# Altium PCB PCB_Palm_v2.0.PcbDoc (part 3 of 3)
Units mil, origin at the board's own origin, x right, y up, seen from the top; angles counter-clockwise.
Board outline 1773 x 1966 mil, 4 copper layers (Top Layer, Signal_1, Signal_2, Bottom Layer), stack 62.008 mil thick; 91 components, 87 nets, 389 pads, 224 vias.
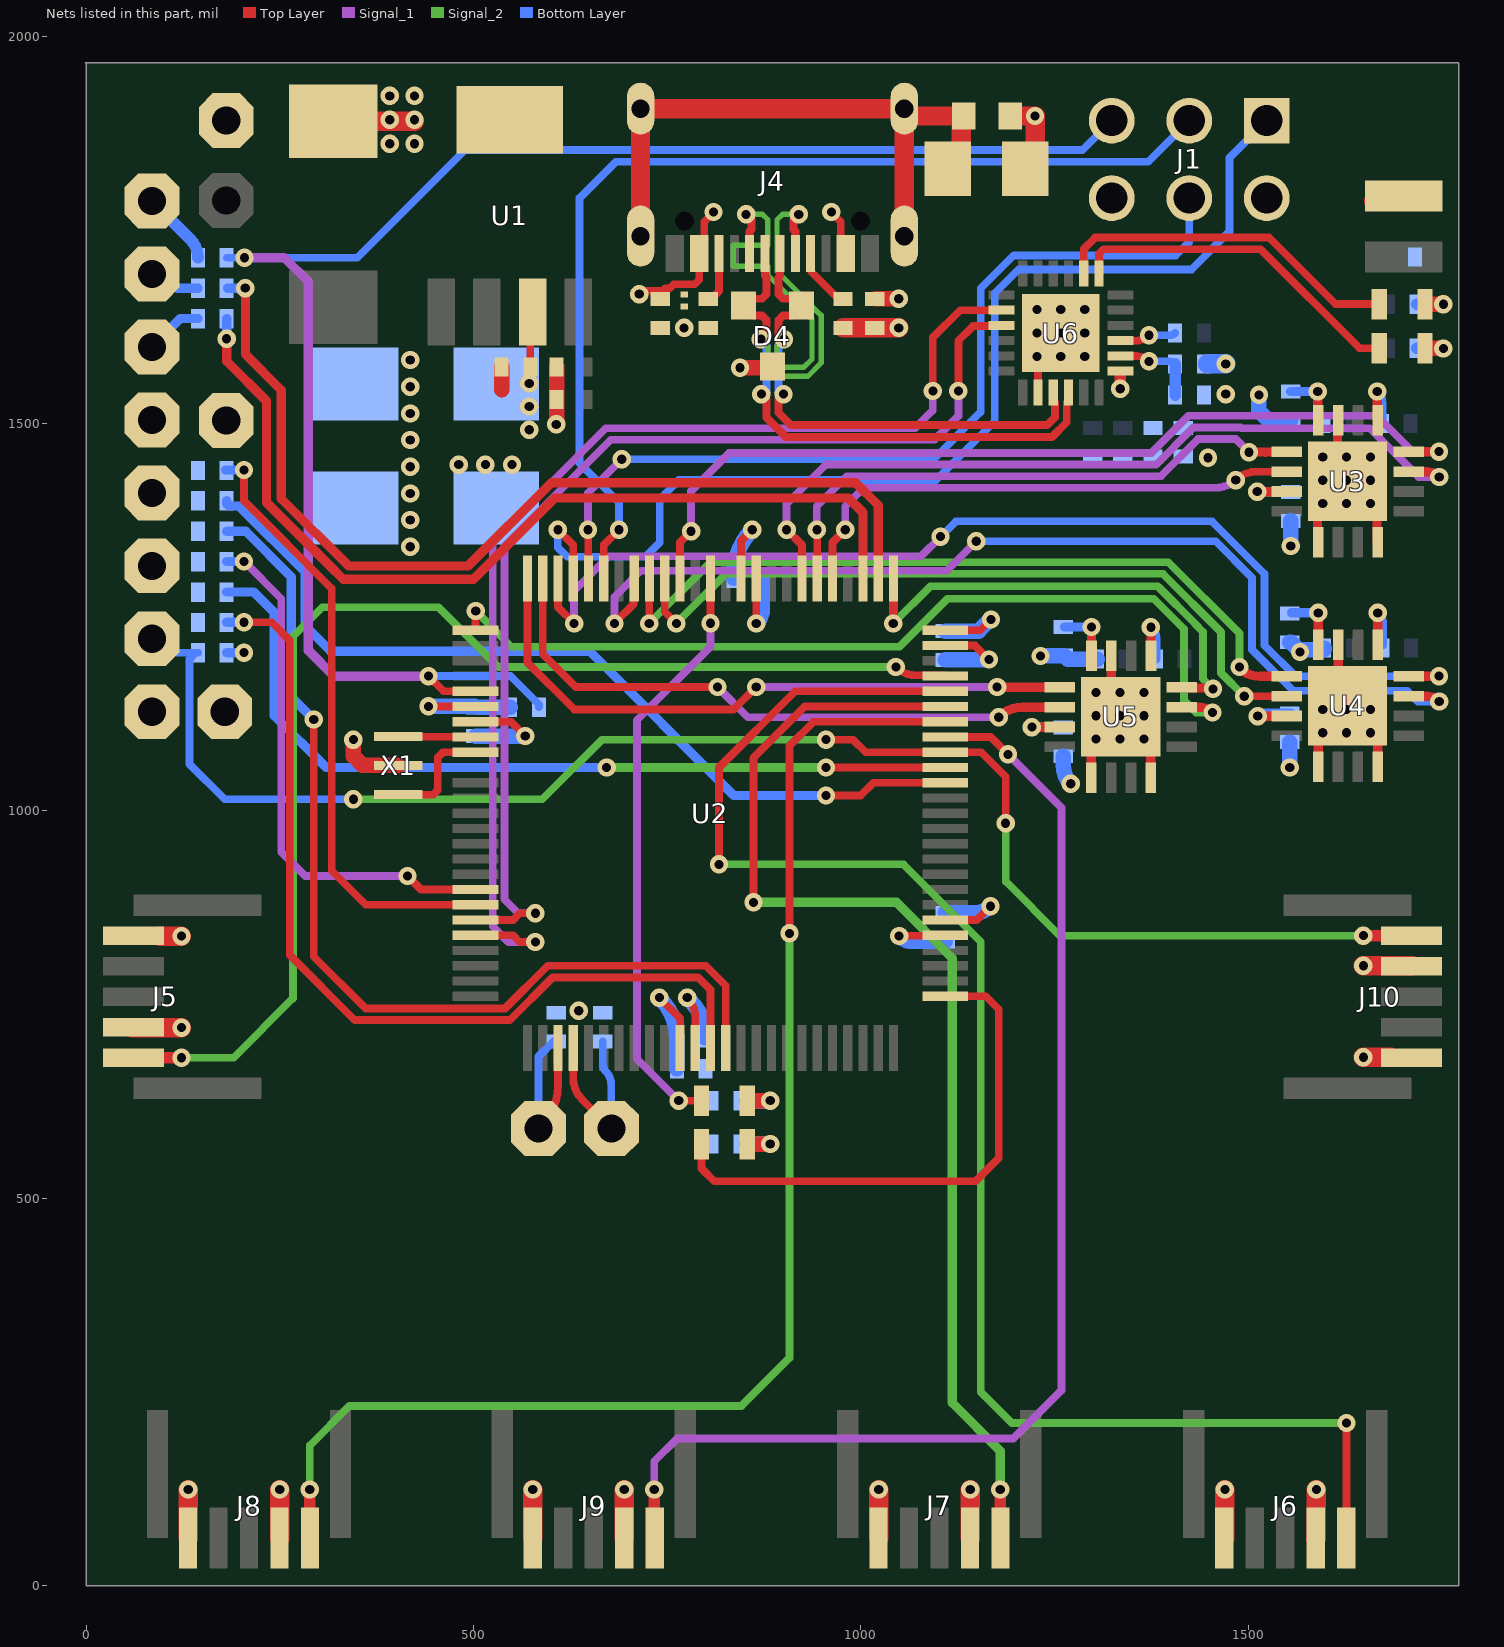
[diagram p4: the nets of this part, all layers, seen from the top]

## Via types
v1: diameter 23.62, hole 11.81, Top Layer to Bottom Layer, tented both sides, 223 vias
v2: diameter 23.62, hole 11.81, Top Layer to Bottom Layer, 1 vias

## Nets (pads, with @x,y where several pads share a name; then routed paths per layer and width w, separated by ;. In a path a pad name is that pad's centre, name@x,y a point inside that pad or via, vN(x,y) a via of type N, cw(c..) or ccw(c..) an arc to the next point about the centre after c; other vN are vias at no path point) (continued)
GND: C1.1 C2.1 C3.1 C4.2 C5.2 C6.2 C7.2 C8.2 C9.2 C10.2 C12.1 C13.1 C15.1 C16.1 C17.1 C19.1 C20.1 C22.2 C23.2 C25.2 C26.2 C27.2 C28.2 D1.2 D4.3 J1.6 J5.5 J6.5 J7.5 J8.5 J9.5 J10.5 J11.1 J21.1 J22.1 R2.1 R3.1 R4.1 R8.2 R9.2 R24.1 Ra.1 U1.5 U2.11 U2.32 U2.62 U2.81 U2.99 U3.1 U3.4 U3.11 U3.17 U4.1 U4.4 U4.11 U4.17 U5.1 U5.4 U5.11 U5.17 U6.2 U6.25 X1.2 | length 2626.6
  Top Layer w10: U2.32@502.85,1115.11 548.5,1115.11 v1(567,1096.61) ; v1(776,759) cw(c751.1,734.1) 786.32,734.1 786.32,727.94 U2.62@786.32,693.85 ; U2.11@845.37,1300.15 845.37,1348.37 v1(860,1363) ; U2.81@1109.15,859.2 1149.68,859.2 v1(1167.48,877.01) ; U2.99@1109.15,1213.54 1147.31,1213.54 v1(1165.39,1195.45) ; v1(1227.25,1586.69) 1228.07,1586.69 U6.25@1228.7,1587.31 ; U6.2@1228.7,1540.07 U6.25@1228.7,1587.31 ; U6.25@1258.23,1616.84 U6.25@1228.7,1587.31
  Top Layer w12: U5.1@1297.67,1042.94 1297.67,1083.68 U5.17@1335.67,1121.68 ; U5.11@1323.47,1200.42 1323.47,1133.88 U5.17@1335.67,1121.68 ; U5.4@1374.47,1042.94 1374.47,1082.88 U5.17@1335.67,1121.68 ; U3.1@1589.58,1346.88 1589.58,1387.62 U3.17@1627.58,1425.62 ; U4.1@1590.32,1061.16 1590.32,1101.9 U4.17@1628.32,1139.9 ; U3.11@1615.38,1504.36 1615.38,1437.82 U3.17@1627.58,1425.62 ; U4.11@1616.12,1218.64 U4.11@1616.12,1214.58 1616.12,1152.1 U4.17@1628.32,1139.9 ; U3.4@1666.38,1346.88 1666.38,1386.82 U3.17@1627.58,1425.62 ; U4.4@1667.12,1061.16 1667.12,1101.1 U4.17@1628.32,1139.9
  Top Layer w20: v1(345,1092) 345,1070.72 356.72,1059 402.6,1059 X1.2@403,1058.6 ; 536.5,1543.5 C1.1@536.5,1573.08 ; v1@607,1501 ccw(c605.79,1502.21) v1@607.5,1502.21 ; v1@607.5,1499 C3.1@607.5,1531.08 C2.1@607.5,1573.08 ; v2(844,1572) 884.37,1572 D4.3@886,1573.63
  Top Layer w25: J5.5@95.96,838.34 v1(123.29,838.34) ; J8.5@131.9,60.97 v1(131.9,124) ; C10.2@312.16,1894 316,1890.16 v1@424,1890.16 ; U1.5@542.06,1890.16 U1.5@544,1892.1 ; J9.5@576.57,60.97 v1(576.57,124) ; R8.2@977,1623.5 C22.2@1018,1623.5 v1(1049,1623.5) ; J7.5@1023.23,60.97 v1(1023.23,124) ; Ra.1@1193,1897 v1(1225,1897) 1225,1842 C17.1@1212,1829 ; J6.5@1469.9,60.97 v1(1469.9,124) ; v1(1648.67,682.14) 1676,682.14 1676.15,682 J10.5@1684.17,682
  Bottom Layer w20: C7.2@502.85,1096.61 v1(567,1096.61) ; v1(776,759) 779.35,755.65 cw(c730.7,707) C9.2@799.5,707 ; C5.2@835.87,1300.15 835.87,1304.75 cw(c918.26,1304.75) C5.2@836.08,1310.55 ; C5.2@836.08,1300 C5.2@836.08,1310.55 ; v1(860,1363) ccw(c918.26,1304.75) 852.95,1354.97 ccw(c918.26,1304.75) C5.2@836.08,1310.55 ; C4.2@1109,868.5 1146.94,868.5 ccw(c1146.94,897.55) v1(1167.48,877.01) ; C6.2@1109.17,1195.02 1109.39,1195.23 1165.18,1195.23 v1(1165.39,1195.45) ; v1(1232,1200) 1260.85,1200 C20.1@1261.41,1200.56 1262.91,1200.56 1267.41,1196.06 C19.1@1304.91,1196.06 ; v1(1514,1537) 1514,1516.22 1525.72,1504.5 C13.1@1555,1504.5 ; C16.1@1553.74,1217.72 1555.24,1217.72 1563.42,1209.53 1566.82,1206.13 v1(1566.82,1205) 1567.8,1205 1570.52,1207.72 1597.24,1207.72 1598.24,1208.72 C15.1@1598.24,1210.22
  Bottom Layer w25: R24.1@1448,1577 v1(1471,1577)
  other v1: 1303.59,1092.75 1334.47,1092.75 1365.34,1092.75 1596.25,1100.9 1627.13,1100.9 1658,1100.9 1303.59,1122.9 1334.47,1122.9 1365.34,1122.9 1596.25,1131.06 1627.13,1131.06 1658,1131.06 1303.59,1153.06 1334.47,1153.06 1365.34,1153.06 1596.25,1396.69 1627.13,1396.69 1658,1396.69 1596.25,1426.84 1627.13,1426.84 1658,1426.84 1448.13,1455.8 1596.25,1457 1627.13,1457 1658,1457 607,1499 1258.13,1586.69 1289,1586.69 1227.25,1616.84 1258.13,1616.84 1289,1616.84 772,1623.5 1227.25,1647 1258.13,1647 1289,1647 392,1861.25 424,1861.25 392,1892.12 424,1892.12 392,1923 424,1923
LED_PIN: LED2.1 U2.76 | length 702.1
  Top Layer w10: LED2.1@794.47,570 794.47,538.53 811,522 1148,522 1178,552 1178,744 1161.22,760.78 U2.76@1109.15,760.78
MEGA_MISO: J1.1 U2.22 | length 1432.3
  Top Layer w10: v1(609,1363) 628.84,1343.17 U2.22@628.84,1300.15
  Bottom Layer w10: v1(609,1363) 609,1340 621,1328 722,1328 740.5,1346.5 740.5,1402.5 765,1427 1097,1427 1173,1503 1173,1668 1204,1699 1427,1699 1476,1748 1476,1843 J1.1@1524,1891
MEGA_MOSI: J1.4 U2.21 | length 1173.5
  Top Layer w10: v1@648.26,1363 648.26,1300.41 U2.21@648.52,1300.15
  Signal_1 w10: v1(648,1363) 648,1410.47 v1(691.53,1454)
  Bottom Layer w10: v1@689.61,1452.08 v1(691.53,1454) 1094,1454 1155,1515 1155,1674.61 1197.39,1717 1406.65,1717 1424,1734.35 J1.4@1424,1791
MEGA_RST: C24.2 J1.5 R1.2 U2.30 | length 2185.9
  Top Layer w10: v1(442,1174) 461.52,1154.48 U2.30@502.85,1154.48
  Signal_1 w12: v1(204.5,1714) 256,1714 287,1683 287,1207 320,1174 v1(442,1174)
  Bottom Layer w10: C24.2@181.5,1714 v1(204.5,1714) 350,1714 489,1853 1286,1853 J1.5@1324,1891 ; v1(442,1174) 548,1174 584.5,1137.5 R1.2@584.5,1134
MEGA_RXD: R18.1 U2.2 | length 1271.5
  Top Layer w12: v1(205.5,1674.75) 205.69,1674.56 205.69,1589.31 252,1543 252,1403.04 338.96,1316.08 493.08,1316.08 600.69,1423.69 993.32,1423.69 1022.54,1394.46 U2.2@1022.54,1300.15
  Bottom Layer w12: R18.1@182.5,1674.75 v1(205.5,1674.75)
MEGA_SCK: J1.3 U2.20 | length 1348.6
  Top Layer w10: U2.20@668.21,1300.15 668.21,1343.17 v1(688.04,1363)
  Bottom Layer w10: v1(688.04,1363) 688.04,1397.96 637,1449 637,1791 684,1838 1371,1838 J1.3@1424,1891
MEGA_TXD: R19.1 U2.3 | length 1205.9
  Top Layer w12: v1(181.5,1609.5) 181.5,1580.5 233,1529 233,1398 313,1318 331.92,1299.08 500.08,1299.08 ; 500.12,1299.08 605.04,1404 984,1404 1002.85,1385.15 U2.3@1002.85,1300.15
  Bottom Layer w12: v1(181.5,1609.5) R19.1@181.5,1635.5
MOTOR1_CLOSE: U2.6 U3.13 | length 741.4
  Top Layer w10: U2.6@943.8,1300.15 v1@943.8,1362.48
  Top Layer w12: v1@1501.21,1463.21 1522.21,1463.21 ; 1522,1463 1522.21,1463.21 ; U3.13@1549.05,1463.21 1522.21,1463.21
  Signal_1 w10: v1(943.28,1363) 943.28,1393.28 982,1432 1387.43,1432 1435.43,1480 1484,1480 v1(1501,1463)
MOTOR1_OPEN: U2.5 U3.14 | length 684.4
  Top Layer w10: U2.5@963.48,1300.15 963.48,1346.44 v1(980.04,1363) ; v1(1484,1427) cw(c1510.12,1400.88) 1510.12,1437.82 U3.14@1549.58,1437.82
  Signal_1 w10: v1(980.04,1363) 980.04,1393.04 1004,1417 1457.03,1417 ccw(c1457.03,1457.97) 1473.99,1420.68 ccw(c1457.03,1457.97) v1@1483.85,1427
MOTOR1_SENSE: J5.1 U2.97 | length 1599
  Top Layer w10: v1(1045.27,1185.73) ccw(c1071,1211.45) 1071,1175.07 1108.24,1175.07 U2.97@1109.15,1174.17
  Top Layer w15: J5.1@60.79,681.49 v1@124.29,681.49
  Signal_2 w10: v1(123.29,681.49) 190.49,681.49 267,758 267,1225 305,1263 455,1263 532.27,1185.73 v1(1045.27,1185.73)
MOTOR2_CLOSE: U2.15 U3.8 | length 1183.1
  Top Layer w10: U2.15@766.63,1300.15 766.63,1346.63 v1(781,1361)
  Top Layer w12: U3.8@1706.32,1463.42 U3.8@1706.61,1463.71 ; U3.8@1707.06,1463.42 v1@1746.16,1463.42
  Signal_1 w10: v1(781,1361) 781,1413 830,1462 1375,1462 1423,1510 1666,1510 1712.29,1463.71 v1(1746.45,1463.71)
MOTOR2_OPEN: U2.7 U3.7 | length 1057.2
  Top Layer w10: v1(904.28,1363) 924.11,1343.17 U2.7@924.11,1300.15
  Top Layer w12: U3.7@1706.32,1437.82 U3.7@1707.21,1436.93 ; U3.7@1707.06,1437.82 1730.28,1437.82 cw(c1730.28,1414.54) v1(1746.74,1431)
  Signal_1 w10: v1(904.28,1363) 904,1363.28 904,1396 955,1447 1325,1447 1381.21,1447 1428.21,1494 1429.21,1495 1490.21,1495 1491.21,1494 1657,1494 1720,1431 v1(1746.74,1431)
MOTOR2_SENSE: J6.1 U2.96 | length 2056.7
  Top Layer w10: v1(817,931) 817,1056 915.48,1154.48 U2.96@1109.15,1154.48 ; J6.1@1626.75,60.32 1626.88,60.45 1626.88,209.87 v1(1627,210)
  Signal_2 w10: v1(817,931) 1055,931 1155,831 1155,250 1195,210 v1(1627,210)
MOTOR3_CLOSE: U2.17 U4.13 | length 1000.1
  Top Layer w10: v1(727,1242) U2.17@727,1299.89
  Top Layer w12: v1(1488.85,1185.85) 1488.85,1185 1488,1185 ccw(c1515.44,1212.44) 1515.44,1173.64 U4.13@1549.58,1173.64
  Signal_2 w10: v1(727,1242) 806,1321 1397,1321 1488.85,1229.15 v1(1488.85,1185.85)
MOTOR3_OPEN: U2.16 U4.14 | length 975
  Top Layer w10: U2.16@746.95,1300.15 746.95,1257.06 v1(762,1242) ; v1(1495,1148) U4.14@1549.57,1148.02
  Signal_2 w10: v1(762,1242) 826,1306 1390,1306 1465,1231 1465,1178 v1(1495,1148)
MOTOR3_SENSE: J7.1 U2.95 | length 1524.3
  Top Layer w10: v1(861.5,882) 861.5,1068.5 927.8,1134.8 U2.95@1109.15,1134.8
  Top Layer w15: J7.1@1180.08,60.32 v1@1180.08,125
  Signal_2 w12: v1(861.5,882) 1046,882 1118.08,809.92 1118.08,235.92 1180.08,173.92 v1(1180.08,124)
MOTOR4_CLOSE: U2.23 U4.8 | length 1438.5
  Top Layer w10: U2.23@609.15,1300.15 609.15,1262.83 v1(629.98,1242)
  Top Layer w12: U4.8@1707.06,1173.64 v1@1746.16,1173.64
  Signal_1 w10: v1(629.98,1242) 629.98,1283.98 674.7,1328.7 1077.7,1328.7 v1(1103,1354)
  Bottom Layer w10: v1(1103,1354) 1123,1374 1453.21,1374 1521,1306.21 1521,1214 1561.07,1173.93 v1(1746.45,1173.93)
MOTOR4_OPEN: U2.18 U4.7 | length 1378.9
  Top Layer w10: v1(682,1242) 706.67,1266.67 706.67,1299.24 U2.18@707.58,1300.15
  Top Layer w12: U4.7@1707.06,1148.04 1730.28,1148.04 cw(c1730.28,1124.75) v1(1746.74,1141.22)
  Signal_1 w10: v1(682,1242) 682,1276 716,1310 1111,1310 v1(1149,1348)
  Bottom Layer w10: v1(1149,1348) 1458,1348 1505,1301 1505,1208 1558,1155 1705.39,1155 1719.17,1141.22 v1(1746.74,1141.22)
MOTOR4_SENSE: J8.1 U2.94 | length 1791.6
  Top Layer w10: v1(908,842) 908,1084 939.11,1115.11 U2.94@1109.15,1115.11
  Top Layer w15: J8.1@288.75,60.32 v1@288.75,125
  Signal_2 w10: v1(288.75,124) 288.75,180.75 340,232 846,232 908,294 v1(908,842)
MOTOR5_CLOSE: U2.25 U5.13 | length 832.5
  Top Layer w10: U2.25@569.78,1300.15 569.78,1191.22 630,1131 836.06,1131 v1(865.06,1160)
  Top Layer w12: v1@1176.52,1159.48 U5.13@1256.93,1159.48
  Signal_1 w10: v1(865.06,1160) v1(1176,1160)
MOTOR5_OPEN: U2.24 U5.14 | length 802.2
  Top Layer w10: U2.24@589.47,1300.15 589.47,1202.53 632,1160 v1(815,1160)
  Top Layer w12: v1(1178,1121) cw(c1209.24,1089.76) 1209.24,1133.94 U5.14@1256.87,1133.94
  Signal_1 w10: v1(815,1160) 854,1121 v1(1178,1121)
MOTOR5_SENSE: J9.1 U2.93 | length 1603.3
  Top Layer w10: U2.93@1109.15,1095.43 1167.58,1095.43 v1(1190,1073)
  Top Layer w15: J9.1@733.42,60.32 v1(733.42,124)
  Signal_1 w10: v1(733.42,124) 733.42,160.42 763,190 1197,190 1259,252 1259,1004 v1(1190,1073)
MOTOR6_CLOSE: U2.1 U5.8 | length 623.1
  Top Layer w12: v1(1042,1242) 1042.22,1242.22 U2.1@1042.22,1300.15 ; U5.8@1414.41,1159.48 1415.15,1158.74 1454.26,1158.74 1455,1158 v1(1454.58,1157.58)
  Signal_2 w10: v1(1042,1242) 1090,1290 1383,1290 1384,1289 1384.21,1289 1432.34,1240.87 1432.34,1240.66 1441.59,1231.41 1441.59,1170.57 v1(1454.58,1157.58)
MOTOR6_OPEN: U2.26 U5.7 | length 1167.5
  Top Layer w10: v1(503,1258) 502.85,1257.85 U2.26@502.85,1233.22 U2.26@503.21,1233.58
  Top Layer w12: U5.7@1414.41,1133.88 1437.62,1133.88 cw(c1437.62,1110.6) v1(1454.08,1127.06)
  Signal_2 w10: v1(503,1258) 549,1212 1050,1212 1112,1274 1378,1274 1417.34,1234.66 1417.34,1142.55 1432.83,1127.06 v1@1444.08,1127.06
MOTOR6_SENSE: J10.1 J23.1 R16.1 U2.92 | length 2028.3
  Top Layer w10: v1(955,1092) 990,1092 1006.26,1075.74 U2.92@1109.15,1075.74 1155.26,1075.74 1187,1044 v1(1187,984)
  Top Layer w15: v1@1647.67,838.99 J10.1@1712.35,838.99
  Signal_2 w10: v1(345,1015) 589,1015 666,1092 v1(955,1092) ; v1(1187,984) 1187,909 1257.01,838.99 v1(1648.67,838.99)
  Bottom Layer w10: J23.1@85,1222.29 99.79,1222.29 118.07,1204 R16.1@141.57,1204 ; R16.1@144.5,1204 R16.1@141.57,1204 ; v1(345,1015) 179,1015 133.57,1060.43 133.57,1196 R16.1@141.57,1204
MUSCLE_SENSE1: R13.1 U2.91 | length 1099.4
  Top Layer w10: v1@955,1056.06 U2.91@1109.15,1056.06
  Signal_2 w12: v1@672.03,1056.03 v1@954.97,1056.03
  Bottom Layer w12: R13.1@181.5,1282.47 216.53,1282.47 243,1256 243,1123 309.94,1056.06 v1(672,1056.06)
  other v1: 955,1056
MUSCLE_SENSE2: R11.1 U2.90 | length 1134.4
  Top Layer w10: v1(955,1020) 1000,1020 1016.37,1036.37 U2.90@1109.15,1036.37
  Bottom Layer w12: R11.1@181.5,1400.17 181.5,1396.67 184.5,1393.67 197.38,1393.67 283,1308.04 283,1239 316,1206 650,1206 836,1020 v1(955,1020)
NetC11_1: C11.1 U3.9 | length 79.9
  Top Layer w12: U3.9@1666.58,1504.36 v1(1666.58,1541.36)
  Bottom Layer w12: v1(1666.58,1541.36) cw(c1652.3,1527.07) 1672.5,1527.07 C11.1@1672.5,1500
NetC13_2: C13.2 U3.12 | length 71.6
  Top Layer w12: U3.12@1589.78,1504.36 v1(1589.78,1541.36)
  Bottom Layer w12: C13.2@1555.14,1541.36 v1(1589.78,1541.36)
NetC14_1: C14.1 U4.9 | length 84
  Top Layer w12: U4.9@1667.32,1214.58 v1(1667.32,1255.64)
  Bottom Layer w12: v1(1667.32,1255.64) cw(c1653.04,1241.35) 1673.24,1241.35 C14.1@1673.24,1214.28
NetC16_2: C16.2 U4.12 | length 71.6
  Top Layer w12: U4.12@1590.52,1218.64 v1(1590.52,1255.64)
  Bottom Layer w12: C16.2@1555.88,1255.64 v1(1590.52,1255.64)
NetC18_1: C18.1 U5.9 | length 80.3
  Top Layer w12: v1(1374.39,1237.14) 1374.67,1237.14 U5.9@1374.67,1200.42
  Bottom Layer w12: v1(1374.39,1237.14) 1374.67,1237.42 cw(c1360.38,1223.13) 1380.58,1223.13 C18.1@1380.58,1196.06
NetC20_2: C20.2 U5.12 | length 71.6
  Top Layer w12: U5.12@1297.87,1200.42 v1(1297.87,1237.42)
  Bottom Layer w12: C20.2@1263.23,1237.42 v1(1297.87,1237.42)
NetC24_1: C24.1 J17.1 | length 96.6
  Bottom Layer w15: J17.1@85,1787.43 134.65,1737.78 cw(c110.88,1714) C24.1@144.5,1714
NetJ4_A5: J4.A5 R8.1 | length 79.4
  Top Layer w10: J4.A5@935.21,1719.5 936.12,1718.59 936.12,1696.02 939.99,1692.15 967.64,1664.5 973,1664.5 R8.1@977,1660.5
NetJ4_B5: J4.B5 R9.1 | length 66.9
  Top Layer w10: R9.1@803,1660.5 806.5,1660.5 810.5,1664.5 817.1,1671.1 J4.B5@817.1,1719.5
NetJ14_1: J14.1 R18.2 | length 67.2
  Bottom Layer w12: J14.1@85,1693.22 99.2,1693.22 117.68,1674.75 R18.2@144.5,1674.75
NetJ15_1: J15.1 R10.2 R11.2 R12.2
NetJ16_1: J16.1 R19.2 | length 74.6
  Bottom Layer w12: J16.1@85,1599.02 121.48,1635.5 R19.2@144.5,1635.5
NetJ18_1: J18.1 R13.2 R14.2 R15.2
NetLED1_2: LED1.2 R3.2 | length 55.9
  Top Layer w20: LED1.2@857,626.08 857.08,626 v1(883.19,626)
  Bottom Layer w20: 853.53,626 v1(883.19,626)
NetLED2_2: LED2.2 R4.2 | length 56
  Top Layer w20: LED2.2@856.81,570 v1(883.19,570)
  Bottom Layer w20: 853.53,570 v1(883.19,570)
NetLED3_1: LED3.1 R21.2 | length 59.3
  Top Layer w20: LED3.1@1728.3,1654.16 1728.46,1654 v1(1752,1654) v1@1753,1654
  Bottom Layer w15: R21.2@1717.5,1654 v1(1752,1654)
NetLED4_1: LED4.1 R22.2 | length 59.3
  Top Layer w20: LED4.1@1728.3,1597.16 1728.38,1597.08 1752.92,1597.08 v1@1753,1597
  Bottom Layer w15: R22.2@1717.5,1597 v1(1752,1597)
NetR5_2: R5.2 U3.15 | length 79.8
  Top Layer w12: v1(1511.73,1412.11) 1548.73,1412.11 U3.15@1548.84,1412.22
  Bottom Layer w12: v1(1511.73,1412.11) R5.2@1554.39,1412.11
NetR6_2: R6.2 U4.15 | length 80.7
  Top Layer w12: v1(1512.47,1122.39) U4.15@1549.47,1122.39
  Bottom Layer w12: v1(1512.47,1122.39) cw(c1522.13,1112.73) 1522.13,1126.39 R6.2@1555.13,1126.39
NetR7_2: R7.2 U5.15 | length 78.7
  Top Layer w12: v1(1220.82,1108.17) U5.15@1256.82,1108.17
  Bottom Layer w12: v1@1219.82,1108.17 v1(1220.82,1108.17) R7.2@1262.47,1108.17
NetR20_1: R20.1 U6.9 | length 73.4
  Top Layer w10: U6.9@1335,1607 1355.1,1607 ccw(c1355.1,1630.9) v1(1372,1614)
  Bottom Layer w10: v1(1372,1614) 1398.87,1614 ccw(c1398.87,1623.7) R20.1@1405.73,1616.84
NetR23_2: R23.2 R24.2 U6.8 | length 113.5
  Top Layer w10: U6.8@1335,1587.31 1355.1,1587.31 cw(c1355.1,1563.42) v1(1372,1580.31)
  Bottom Layer w10: v1(1372,1580.31) 1397.35,1580.31 cw(c1397.35,1568.46) R24.2@1405.73,1576.84
  Bottom Layer w15: R23.2@1405.73,1536.84 R24.2@1405.73,1576.84
NetU2_33: U2.33 X1.1 | length 100.1
  Top Layer w10: X1.1@403,1096 403.29,1095.71 502.56,1095.71 U2.33@502.85,1095.43
NetU2_34: U2.34 X1.3 | length 147.2
  Top Layer w10: X1.3@403,1021.2 403.2,1021 448,1021 454,1027 454,1069 460.74,1075.74 U2.34@502.85,1075.74
PALM_LED: LED1.1 U2.13 | length 765.3
  Top Layer w10: v1(765,626) LED1.1@794.47,626 ; v1(806,1242.26) U2.13@806,1300.15
  Signal_1 w10: v1(765,626) 711,680 711,1117 806,1212 v1(806,1242.26)
PC0: J13.1 R25.2 U2.53 | length 254.5
  Top Layer w10: J13.1@584,590 588.49,594.49 ccw(c538.99,644) 609,644 609.15,644.15 U2.53@609.15,693.85 608.24,692.94 U2.53@608.24,675.02
  Bottom Layer w10: J13.1@584,590 584,683 603.5,702.5 R25.2@607,702.5
PC1: J12.1 R17.2 U2.54 | length 238
  Top Layer w10: U2.54@628.84,693.85 628.84,655 ccw(c667.06,655) 640.03,627.97 J12.1@678,590
  Bottom Layer w10: R17.2@667,702.5 667,672.24 ccw(c677.24,672.24) 670,665 cw(c650.68,645.68) 678,645.68 J12.1@678,590
PRGM_RX: U2.46 U6.20 | length 1476.3
  Top Layer w10: U2.46@502.85,839.52 551.21,839.52 560,830.72 v1(580,830.72) ; v1(1093,1542) 1093,1611 1128.37,1646.37 U6.20@1181.46,1646.37
  Signal_1 w10: v1(580,830.72) 545.28,830.72 525,851 525,1348 671,1494 1070,1494 1093,1517 v1(1093,1542)
PRGM_TX: U2.45 U6.21 | length 1400.4
  Top Layer w10: U2.45@502.85,859.2 551.21,859.2 560,868 v1(580,868) ; v1(1126,1542) 1126,1607 1144.78,1625.78 1180.55,1625.78 U6.21@1181.46,1626.68
  Signal_1 w10: v1(580,868) 558,868 540,886 540,1341.79 677.21,1479 1095.21,1479 1126,1509.79 v1(1126,1542)
RXD3: R15.1 U2.63 | length 1179.3
  Top Layer w10: v1(204,1243.53) 239.47,1243.53 263,1220 263,814 347,730 547,730 602,785 790,785 806,769 U2.63@806,693.85
  Bottom Layer w12: R15.1@181.65,1243.38 v1@203.85,1243.38
RXLED: LED4.2 U6.13 | length 442.7
  Top Layer w10: U6.13@1307.44,1693.61 1307.44,1719.14 1313.3,1725 1516,1725 1643.84,1597.16 LED4.2@1669.24,1597.16
SCL: R14.1 U2.43 | length 688.4
  Top Layer w10: v1(415,916) 432.43,898.57 U2.43@502.85,898.57
  Signal_1 w10: v1(204,1322) 252,1274 252,947 283,916 v1(415,916)
  Bottom Layer w10: R14.1@181.5,1321.7 R14.1@181.65,1321.85 ; v1@203.85,1321.85 v1(204,1322)
  Bottom Layer w12: R14.1@181.65,1321.85 v1@203.85,1321.85
SDA: R12.1 U2.44 | length 791.8
  Top Layer w10: v1(204,1440) 204,1400 317,1287 317,923 361.11,878.89 U2.44@502.85,878.89
  Bottom Layer w12: R12.1@180.1,1440 v1(204,1440)
SHELL: C17.2 J4.S1 J4.S2 J4.S3 J4.S4 Ra.2 | length 830.1
  Top Layer w25: J4.S2@712,1910 715.72,1906.28 J4.S1@715.72,1741.94 ; J4.S2@715.72,1906.5 J4.S3@1056.28,1906.5 J4.S3@1056.28,1901.82 ; J4.S4@1056.28,1741.94 J4.S3@1056.28,1901.82 ; C17.2@1112,1829 1129.5,1846.5 1129.5,1891 1133,1894.5 Ra.2@1133,1897 1061.1,1897 J4.S3@1056.28,1901.82
TXD3: R10.1 U2.64 | length 1283.2
  Top Layer w10: v1(294,1118) 294,812 361,745 540.79,745 595.79,800 800,800 825.69,774.31 U2.64@825.69,693.85
  Bottom Layer w12: R10.1@181.5,1360.93 206.07,1360.93 265,1302 265,1147 v1(294,1118)
TXLED: LED3.2 U6.14 | length 454.8
  Top Layer w10: U6.14@1287.76,1693.61 1287.76,1725.35 1302.41,1740 1527,1740 1612.84,1654.16 LED3.2@1669.24,1654.16
USB_D_N: D4.2 J4.A7 J4.B7 U6.4 | length 1117.6
  Top Layer w10.25: v1(871.69,1538) 878.38,1531.31 878.38,1507.68 903.31,1482.75 1246.92,1482.75 1265.85,1501.68 1265.85,1527.03 1268.07,1529.24 U6.4@1268.07,1540.07 ; J4.A7@876.16,1719.5 876.16,1690.75 878.38,1688.53 878.38,1667.1 872.37,1661.09 857.32,1661.09 D4.2@848.6,1652.37 848.6,1650.4 859.62,1639.38 872.37,1639.38 878.38,1633.38 v1@878.38,1614 ; J4.B7@915.53,1719.5 915.53,1748.24 913.31,1750.46 913.31,1763.31 v1(920,1770)
  Signal_2 w6.84: v1(871,1609) 880.08,1599.92 880.08,1574.1 893.18,1561 931.74,1561 948.84,1578.1 948.84,1639.69 891.92,1696.61 891.92,1763 898.92,1770 v1(920,1770)
  Bottom Layer w10.25: v1(871,1609) 878.38,1601.62 878.38,1541 877.98,1540.61 cw(c871.69,1546.9) v1(871.69,1538)
USB_D_P: D4.1 J4.A6 J4.B6 U6.3 | length 1117.6
  Top Layer w10.25: v1(852,1770) 858.69,1763.31 858.69,1750.46 856.47,1748.24 J4.B6@856.47,1719.5 ; v1@893.63,1614 893.63,1633.38 899.63,1639.38 912.39,1639.38 923.4,1650.4 D4.1@923.4,1652.37 914.68,1661.09 899.63,1661.09 893.63,1667.1 893.63,1688.53 895.84,1690.75 J4.A6@895.84,1719.5 ; v1(900.31,1538) 893.63,1531.31 893.63,1514 909.63,1498 1240.6,1498 1250.6,1508 1250.6,1527.03 1248.39,1529.24 U6.3@1248.39,1540.07
  Signal_2 w6.84: v1(852,1770) 873.08,1770 880.08,1763 880.08,1760.31 880.08,1730.06 835.2,1730.06 835.2,1703.22 880.08,1703.22 880.08,1691.71 881.64,1690.15 937,1634.79 937,1583 926.84,1572.84 898.08,1572.84 891.92,1579 891.92,1599.92 v1(901,1609)
  Bottom Layer w10.25: v1(900.31,1538) cw(c900.31,1546.9) 894.02,1540.61 893.63,1541 893.63,1601.62 v1(901,1609)
VCC: C4.1 C5.1 C6.1 C7.1 C8.1 C9.1 D2.2 D3.2 J1.2 J3.1 J5.2 J6.2 J7.2 J8.2 J9.2 J10.2 J19.1 J20.1 R1.1 R5.1 R6.1 R7.1 R16.2 R17.1 R25.1 U2.10 U2.31 U2.61 U2.80 U2.100 | length 1276.7
  Top Layer w10: v1(442,1135) 442.1,1134.9 502.75,1134.9 U2.31@502.85,1134.8 ; v1(740,759) 767,732 767,694.22 U2.61@766.63,693.85 U2.61@765.73,694.76 ; v1(865.06,1242) U2.10@865.06,1300.15 ; v1@1049.59,838.72 U2.80@1110.23,838.72 ; U2.80@1091.08,839.52 U2.80@1109.15,839.52 cw(c1110.33,838.34) U2.80@1110.33,840.01 ; U2.100@1109.15,1233.22 1154.22,1233.22 v1(1168,1247)
  Top Layer w25: J5.2@60.26,720.24 v1(123.29,720.24) ; J8.2@250,60.97 v1(250,124) ; J9.2@694.67,60.97 v1(694.67,124) ; J7.2@1141.33,60.97 v1(1141.33,124) ; J6.2@1587.35,60.32 1588,60.97 v1(1588,124) ; v1(1648.67,800.24) J10.2@1711.7,800.24 ; J3.1@1662,1787 1671,1796 J3.1@1701,1796
  Bottom Layer w12: R16.2@181.65,1204.15 v1@203.85,1204.15
  Bottom Layer w20: v1(442,1135) C7.1@501.46,1135 ; C7.1@505.35,1134 R1.1@547.5,1134 ; v1@635,741 v1(636,742) ; v1(740,759) 741.64,757.36 cw(c691.28,707) C9.1@762.5,707 C8.1@762.5,667 ; v1(865.06,1242) ccw(c846.19,1260.87) 872.87,1260.87 C5.1@872.87,1300.15 ; v1(1049.48,838.62) ccw(c1066.67,855.81) 1066.67,831.5 C4.1@1109,831.5 ; C6.1@1109.17,1232.02 1152.04,1232.02 1167.02,1247 v1(1168,1247) ; R7.1@1261.41,1070.56 1261.41,1058.16 ccw(c1294.16,1058.16) 1263.91,1045.61 ccw(c1294.16,1058.16) 1266.75,1040.23 ccw(c1294.16,1058.16) v1(1271,1035) ; v1(1553.74,1056.15) R6.1@1553.74,1088.72 ; v1(1555,1341.93) R5.1@1555,1374.5
  other v1: 204,1204.3 418.42,1340.96 418.42,1375.39 418.42,1409.81 418.42,1444.24 418.42,1478.66 418.42,1513.09 418.42,1547.51 418.42,1581.94
VCC#: C1.2 D3.1 U1.3 | length 81
  Top Layer w10: C1.2@573.5,1563.08 U1.3@573.5,1644.03
  other v1: 572,1492 572,1521.92 572,1551.84
VUSB: C22.1 C23.1 C25.1 C26.1 D1.1 D2.1 J4.A4/B9 J4.B4/A9 R23.1 U6.7 | length 273.4
  Top Layer w10: v1(714,1667) 718.4,1671.4 744.4,1671.4 747.5,1674.5 ; C23.1@741,1660.5 741,1668 747.5,1674.5 ; J4.B4/A9@791.51,1719.5 791.51,1685.51 785.65,1679.65 758.65,1679.65 753.5,1674.5 747.5,1674.5 ; J4.B4/A9@798,1735 798,1760.33 810,1772.33 v1(810,1773) ; v1@962,1772.33 974,1760.33 J4.A4/B9@974,1735 ; C22.1@1018,1660.5 C22.1@1019.5,1662
  Top Layer w15: v1(1335,1545) U6.7@1335,1565.63
  Top Layer w20: C22.1@1019.5,1661 v1(1049,1661)
  other v1: 481,1447 515.43,1447 549.85,1447 1471,1538 962,1773
pads on no net: J4.A1/B12 J4.A8 J4.B1/A12 J4.B8 J4.MH J5.MP1 J5.MP2 J6.MP1 J6.MP2 J7.MP1 J7.MP2 J8.MP1 J8.MP2 J9.MP1 J9.MP2 J10.MP1 J10.MP2 U1.2 U2.4 U2.8 U2.9 U2.12 U2.14 U2.19 U2.27 U2.28 U2.29 U2.35 U2.36 U2.37 U2.38 U2.39 U2.40 U2.41 U2.42 U2.47 U2.48 U2.49 U2.50 U2.51 U2.52 U2.55 U2.56 U2.57 U2.58 U2.59 U2.60 U2.65 U2.66 U2.67 U2.68 U2.69 U2.70 U2.71 U2.72 U2.73 U2.74 U2.75 U2.79 U2.82 U2.83 U2.84 U2.85 U2.86 U2.87 U2.98 U3.6 U4.6 U5.6 U6.1 U6.10 U6.11 U6.12 U6.15 U6.16 U6.17 U6.18 U6.19 U6.22 U6.23 U6.24

## Polygon pours and split planes (outlines as drawn)
6V on Signal_1 "6V_L02_P001" (solid, remove dead copper, pour order 1): 1400,1558 1400,1482 1769,1482 1769,1848 214,1848 137,1848 137,1558
VCC on Signal_1 "VCC_L02_P009" (solid, remove dead copper, pour order 9): 0,1966.23 1772,1965.77 1772,0 0,0
6V on Signal_2 "NONET_L-01_P-001" (solid, remove dead copper, pour order 7): 1458,1269 1278.91,1269 1278.91,1102.27 1281.61,1099.57 1278.91,1096.86 1278.91,1041.93 1772,1041.93 1772,1561 1502,1561 1502,1423 1458,1379
VCC on Signal_2 "VCC_L03_P010" (solid, remove dead copper, pour order 10): 0,1966.23 1772,1965.77 1772,0 0,0
VUSB on Signal_2 "VUSB_L03_P002" (solid, remove dead copper, pour order 2): 1110,1713 1493,1713 1493,1462 1458,1427 779,1427 461,1427 461,1806 1110,1806
GND on Top Layer "GND_L01_P005" (solid, remove dead copper, pour order 5): 0,1966.23 1772,1965.77 1772,0 0,0
GND on Bottom Layer "GND_L04_P008" (solid, remove dead copper, pour order 8): 0,1966.23 1772,1965.77 1772,0 0,0

## Other copper
Top Layer:
  rectangle net VCC#: 554,1474 589,1687
  region net 6V: 481,1600 481,1711 259,1711 259,1600
  rectangle net GND: 1175,1789 1254,1918
  rectangle net VUSB: 700,1650 754,1675
  rectangle net CP_VDD: 1298,1481 1333.23,1510
  rectangle net GND: 726,1604 822,1638
  rectangle net CP_VDD: 1281,1481 1314,1558
  rectangle net GND: 764,1625 780,1654.87
  rectangle net VUSB: 700,1660.5 779,1686
  region net SHELL: 738,1897.6 695,1897.6 695,1693 738,1693
  region net SHELL: 1078,1861 1078,1943.91 695,1943.91 695,1861
  rectangle net 6V: 612,1600 632.58,1698
  rectangle net GND: 144,1841 620,1944
  rectangle net SHELL: 1035,1698 1149,1944
  rectangle net VCC: 1490,1755 1753,1825
  rectangle net 6V: 625,1508 684,1698
Bottom Layer:
  rectangle net CP_VDD: 1663,1583 1692,1667
  region net MOTOR6_SENSE: 154,1191 154,1216.43 68,1216.43 68,1191
  region net NetJ15_1: 155,1390 155,1430.29 60,1430.29 60,1390
  region net NetJ18_1: 155,1295 155,1336 60,1336 60,1295
  rectangle net NetJ18_1: 134,1230.3 155.5,1335.3
  rectangle net NetJ15_1: 133,1348 155.5,1453
  rectangle net VCC: 592,728 681,757
  rectangle net GND: 787,550 820,704
  rectangle net VCC#: 467,1474 590,1600
  rectangle net GND: 1283.23,1445 1465,1470
  rectangle net VUSB: 1427,1482 1485,1554
  rectangle net VUSB: 1360,1482 1450,1507
  rectangle net CP_VDD: 1281,1481 1354,1510
  rectangle net VUSB: 467,1333 587,1461
  rectangle net VCC: 283,1328 434,1606

## Silkscreen, mask and mechanical layers (free items; w line width, h text height)
Top Overlay:
  lines w7: 757,1507 745,1519 745,1576 773,1604 773,1637 ; 803.3,1577.97 803.3,1603 ; 1211,1918 1242,1918 1257,1903 1257,1775
  text "GND" at 143.8,1934.41 h35
  text "RST" at 3.44,1829.55 h40 r270
  text "RXD" at 3.44,1736.55 h40 r270
  text "6V" at 143.8,1717.41 h35
  text "SPI" at 1370,1690.6 h40
  text "TXD" at 3.44,1642.55 h40 r270
  text "TX" at 1563,1630.21 h40
  text "RX" at 1563,1573.21 h40
  text "VCC" at 3.44,1547.84 h40 r270
  text "GND" at 140.03,1546.44 h40
  text "TP8" at 3.44,1452.84 h40 r270
  text "TP9" at 3.44,1357.84 h40 r270
  text "MOTOR6_SENSE" at 126.1,1201.44 h40
  text "VCC" at 40.16,1045.44 h40
  text "GND" at 136.03,1045.44 h40
  text "PALM_LED" at 894,601.6 h45
  text "LED_PIN" at 894.5,545.6 h45
  text "PC0" at 541.17,505.44 h40
  text "PC1" at 636.17,505.44 h40
Bottom Overlay:
  drawing of 2581 lines, arcs and shapes, not listed
  text "GND" at 343.56,1853 h60
  text "6V" at 342.95,1752.5 h60
  text "~" at 211.71,1169.97 h70
  text "~" at 164.71,719.97 h70
Board Outline:
  circle w20: c1322.5,78.75 r39.37
  circle w20: c1693.25,1887.25 r39.37
  circle w20: c78.75,1887.25 r39.37
  circle w20: c437,78.75 r39.37
  circle w20: c879.75,78.75 r39.37
  lines w20: 0,0 1772,0 1772,1966 0,1966 0,0
Fabrication:
  drawing of 295 lines, arcs and shapes, not listed
  text "Layer" at 2311.58,1734 h60
  text "Name" at 2721.49,1734 h60
  text "Material" at 3651.23,1734 h60
  text "Thickness" at 4511,1734 h60
  text "Constant" at 5160.84,1734 h60
  text "Board Layer Stack" at 5730.7,1734 h60
  text "Top Overlay" at 2721.49,1614 h60
  text "Top Solder" at 2721.49,1494 h60
  text "Solder Resist" at 3651.23,1494 h60
  text "0.39mil" at 4511,1494 h60
  text "3.5" at 5160.84,1494 h60
  text "1" at 2311.58,1374 h60
  text "Top Layer" at 2721.49,1374 h60
  text "1.38mil" at 4511,1374 h60
  text "Dielectric 2" at 2721.49,1254 h60
  text "PP-006" at 3651.23,1254 h60
  text "8.27mil" at 4511,1254 h60
  text "4.1" at 5160.84,1254 h60
  text "2" at 2311.58,1134 h60
  text "Signal_1" at 2721.49,1134 h60
  text "CF-004" at 3651.23,1134 h60
  text "0.39mil" at 4511,1134 h60
  text "Dielectric 1" at 2721.49,1014 h60
  text "FR-4" at 3651.23,1014 h60
  text "41.93mil" at 4511,1014 h60
  text "4.8" at 5160.84,1014 h60
  text "3" at 2311.58,894 h60
  text "Signal_2" at 2721.49,894 h60
  text "CF-004" at 3651.23,894 h60
  text "0.39mil" at 4511,894 h60
  text "Dielectric 3" at 2721.49,774 h60
  text "PP-006" at 3651.23,774 h60
  text "8.27mil" at 4511,774 h60
  text "4.1" at 5160.84,774 h60
  text "4" at 2311.58,654 h60
  text "Bottom Layer" at 2721.49,654 h60
  text "1.38mil" at 4511,654 h60
  text "Bottom Solder" at 2721.49,534 h60
  text "Solder Resist" at 3651.23,534 h60
  text "0.39mil" at 4511,534 h60
  text "3.5" at 5160.84,534 h60
  text "Bottom Overlay" at 2721.49,414 h60
  text "Total board thickness:" at 2311.58,294 h60
  text "62.80mil" at 4511,294 h60
Drill Drawing:
  circle w10: c-85.38,3154.27 r33.33
  lines w10: -118.71,2820.94 -52.04,2820.94 -52.04,2887.61 -118.71,2887.61 -118.71,2820.94 ; -118.71,2970.94 -85.38,2987.61 -52.04,2970.94 -68.71,3004.27 -52.04,3037.61 -85.38,3020.94 -118.71,3037.61 -102.04,3004.27 -118.71,2970.94 ; -118.71,3337.61 -52.04,3337.61 -85.38,3270.94 -118.71,3337.61 ; -118.71,3437.61 -102.04,3437.61 -102.04,3420.94 -68.71,3420.94 -68.71,3437.61 -52.04,3437.61 -52.04,3470.94 -68.71,3470.94 -68.71,3487.61 -102.04,3487.61 -102.04,3470.94 -118.71,3470.94 -118.71,3437.61 ; -118.71,3587.61 -102.04,3587.61 -85.38,3570.94 -68.71,3587.61 -52.04,3587.61 -68.71,3604.27 -52.04,3620.94 -68.71,3620.94 -85.38,3637.61 -102.04,3620.94 -118.71,3620.94 -102.04,3604.27 -118.71,3587.61
  lines w15: -178.5,2775.94 9778.72,2775.94 ; -178.5,3675.94 9778.72,3675.94 ; 372.38,2625.94 372.38,3825.94 ; 972.22,2625.94 972.22,3825.94 ; 2071.9,2625.94 2071.9,3825.94 ; 2577.77,2625.94 2577.77,3825.94 ; 3311.57,2625.94 3311.57,3825.94 ; 4811.13,2625.94 4811.13,3825.94 ; 5400.97,2625.94 5400.97,3825.94 ; 6146.77,2625.94 6146.77,3825.94 ; 7286.44,2625.94 7286.44,3825.94 ; 8376.12,2625.94 8376.12,3825.94 ; -178.5,2625.94 9778.72,2625.94 9778.72,3825.94 -178.5,3825.94 -178.5,2625.94
  text "Symbol" at -88.5,3720.94 h72
  text "Count" at 417.38,3720.94 h72
  text "Hole Size" at 1017.22,3720.94 h72
  text "Plated" at 2116.9,3720.94 h72
  text "Hole Type" at 2622.77,3720.94 h72
  text "Drill Layer Pair" at 3356.57,3720.94 h72
  text "Via/Pad" at 4856.13,3720.94 h72
  text "Pad Shape" at 5445.97,3720.94 h72
  text "Template" at 6191.77,3720.94 h72
  text "Hole Length" at 7331.44,3720.94 h72
  text "Routed Path Length" at 8421.12,3720.94 h72
  text "224" at 417.38,3570.94 h60
  text "0.300mm (11.81mil)" at 1017.22,3570.94 h60
  text "PTH" at 2116.9,3570.94 h60
  text "Round" at 2622.77,3570.94 h60
  text "Top Layer - Bottom Layer" at 3356.57,3570.94 h60
  text "Via" at 4856.13,3570.94 h60
  text "Rounded" at 5445.97,3570.94 h60
  text "(Mixed)" at 6191.77,3570.94 h60
  text "-" at 7331.44,3570.94 h60
  text "-" at 8421.12,3570.94 h60
  text "2" at 417.38,3420.94 h60
  text "0.600mm (23.62mil)" at 1017.22,3420.94 h60
  text "PTH" at 2116.9,3420.94 h60
  text "Slot" at 2622.77,3420.94 h60
  text "Top Layer - Bottom Layer" at 3356.57,3420.94 h60
  text "Pad" at 4856.13,3420.94 h60
  text "Rounded" at 5445.97,3420.94 h60
  text "r90_170h60_140r100" at 6191.77,3420.94 h60
  text "1.400mm (55.12mil)" at 7331.44,3420.94 h60
  text "0.800mm (31.50mil)" at 8421.12,3420.94 h60
  text "2" at 417.38,3270.94 h60
  text "0.600mm (23.62mil)" at 1017.22,3270.94 h60
  text "PTH" at 2116.9,3270.94 h60
  text "Slot" at 2622.77,3270.94 h60
  text "Top Layer - Bottom Layer" at 3356.57,3270.94 h60
  text "Pad" at 4856.13,3270.94 h60
  text "Rounded" at 5445.97,3270.94 h60
  text "(Mixed)" at 6191.77,3270.94 h60
  text "1.700mm (66.93mil)" at 7331.44,3270.94 h60
  text "1.100mm (43.31mil)" at 8421.12,3270.94 h60
  text "2" at 417.38,3120.94 h60
  text "0.620mm (24.41mil)" at 1017.22,3120.94 h60
  text "NPTH" at 2116.9,3120.94 h60
  text "Round" at 2622.77,3120.94 h60
  text "Top Layer - Bottom Layer" at 3356.57,3120.94 h60
  text "Pad" at 4856.13,3120.94 h60
  text "Rounded" at 5445.97,3120.94 h60
  text "c0hn62" at 6191.77,3120.94 h60
  text "-" at 7331.44,3120.94 h60
  text "-" at 8421.12,3120.94 h60
  text "14" at 417.38,2970.94 h60
  text "0.920mm (36.22mil)" at 1017.22,2970.94 h60
  text "PTH" at 2116.9,2970.94 h60
  text "Round" at 2622.77,2970.94 h60
  text "Top Layer - Bottom Layer" at 3356.57,2970.94 h60
  text "Pad" at 4856.13,2970.94 h60
  text "Octagonal" at 5445.97,2970.94 h60
  text "s180h92c50" at 6191.77,2970.94 h60
  text "-" at 7331.44,2970.94 h60
  text "-" at 8421.12,2970.94 h60
  text "6" at 417.38,2820.94 h60
  text "1.020mm (40.16mil)" at 1017.22,2820.94 h60
  text "PTH" at 2116.9,2820.94 h60
  text "Round" at 2622.77,2820.94 h60
  text "Top Layer - Bottom Layer" at 3356.57,2820.94 h60
  text "Pad" at 4856.13,2820.94 h60
  text "(Mixed)" at 5445.97,2820.94 h60
  text "(Mixed)" at 6191.77,2820.94 h60
  text "-" at 7331.44,2820.94 h60
  text "-" at 8421.12,2820.94 h60
  text "250 Total" at 417.38,2670.94 h60
  text "Slot definitions :" at -88.5,2525.97 h60
  text "Routed Path Length" at 944.19,2525.97 h60
  text "= Calculated from tool start centre position to tool end centre position." at 2046.86,2525.97 h60
  text "Hole Length" at 944.19,2425.99 h60
  text "= Routed Path Length + Tool Size = Slot length as defined in the PCB layout" at 1636.99,2425.99 h60

## Dimensions
0,1966 to 0,0 on Dimension
1772,1966 to 0,0 on Dimension

## Text inside footprints (layer, text, board x,y; h text height)
J4: Top Overlay "PCB Edge" at 938.69,1931.04 h31.5 r180